# EAGLE board board (EAGLE 9.6.2)

Size 30 x 20 mm. Coordinates in mm from the lower left corner, seen from the top.
Outline: 0,0 30,0 30,20 0,20 0,0
Copper layers used: 

## Footprints (pad centres in the part's own frame; a part is rotated, then mirrored left to right if it is on the bottom)
HDR2 = drill 1: P1 0,0; P2 2.54,0 | smd 1 x 2: S1 5,1

## Placement (x,y rotation side)
U1  [HDR2]  10,10 0 top
U2  [HDR2]  20,5 90 top

## Library data of the parts
U1 U2 = qa